# Altium PCB PCB04.PcbDoc
Units mil, origin at the board's own origin, x right, y up, seen from the top; angles counter-clockwise.
Board outline 1200 x 1700 mil, 2 copper layers (Top Layer, Bottom Layer); 21 components, 17 nets, 68 pads, 0 vias.
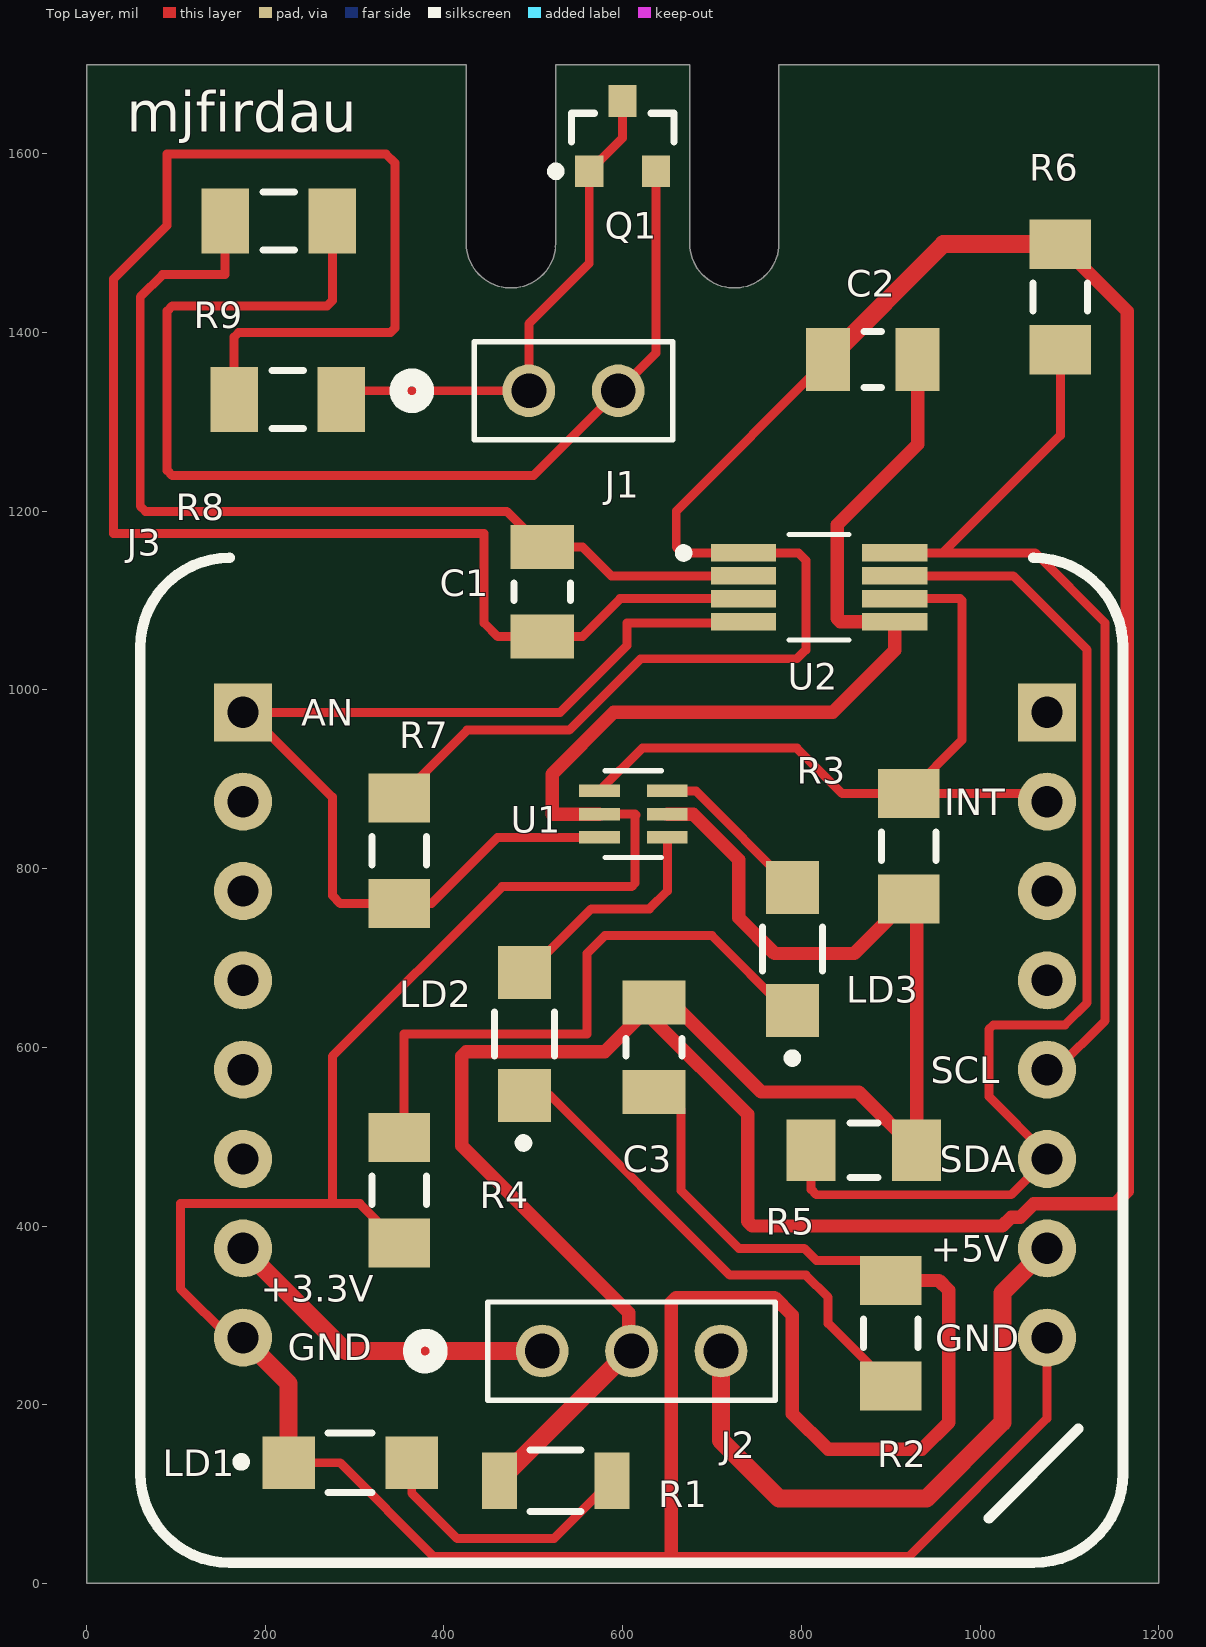
[diagram p0: Top Layer view]
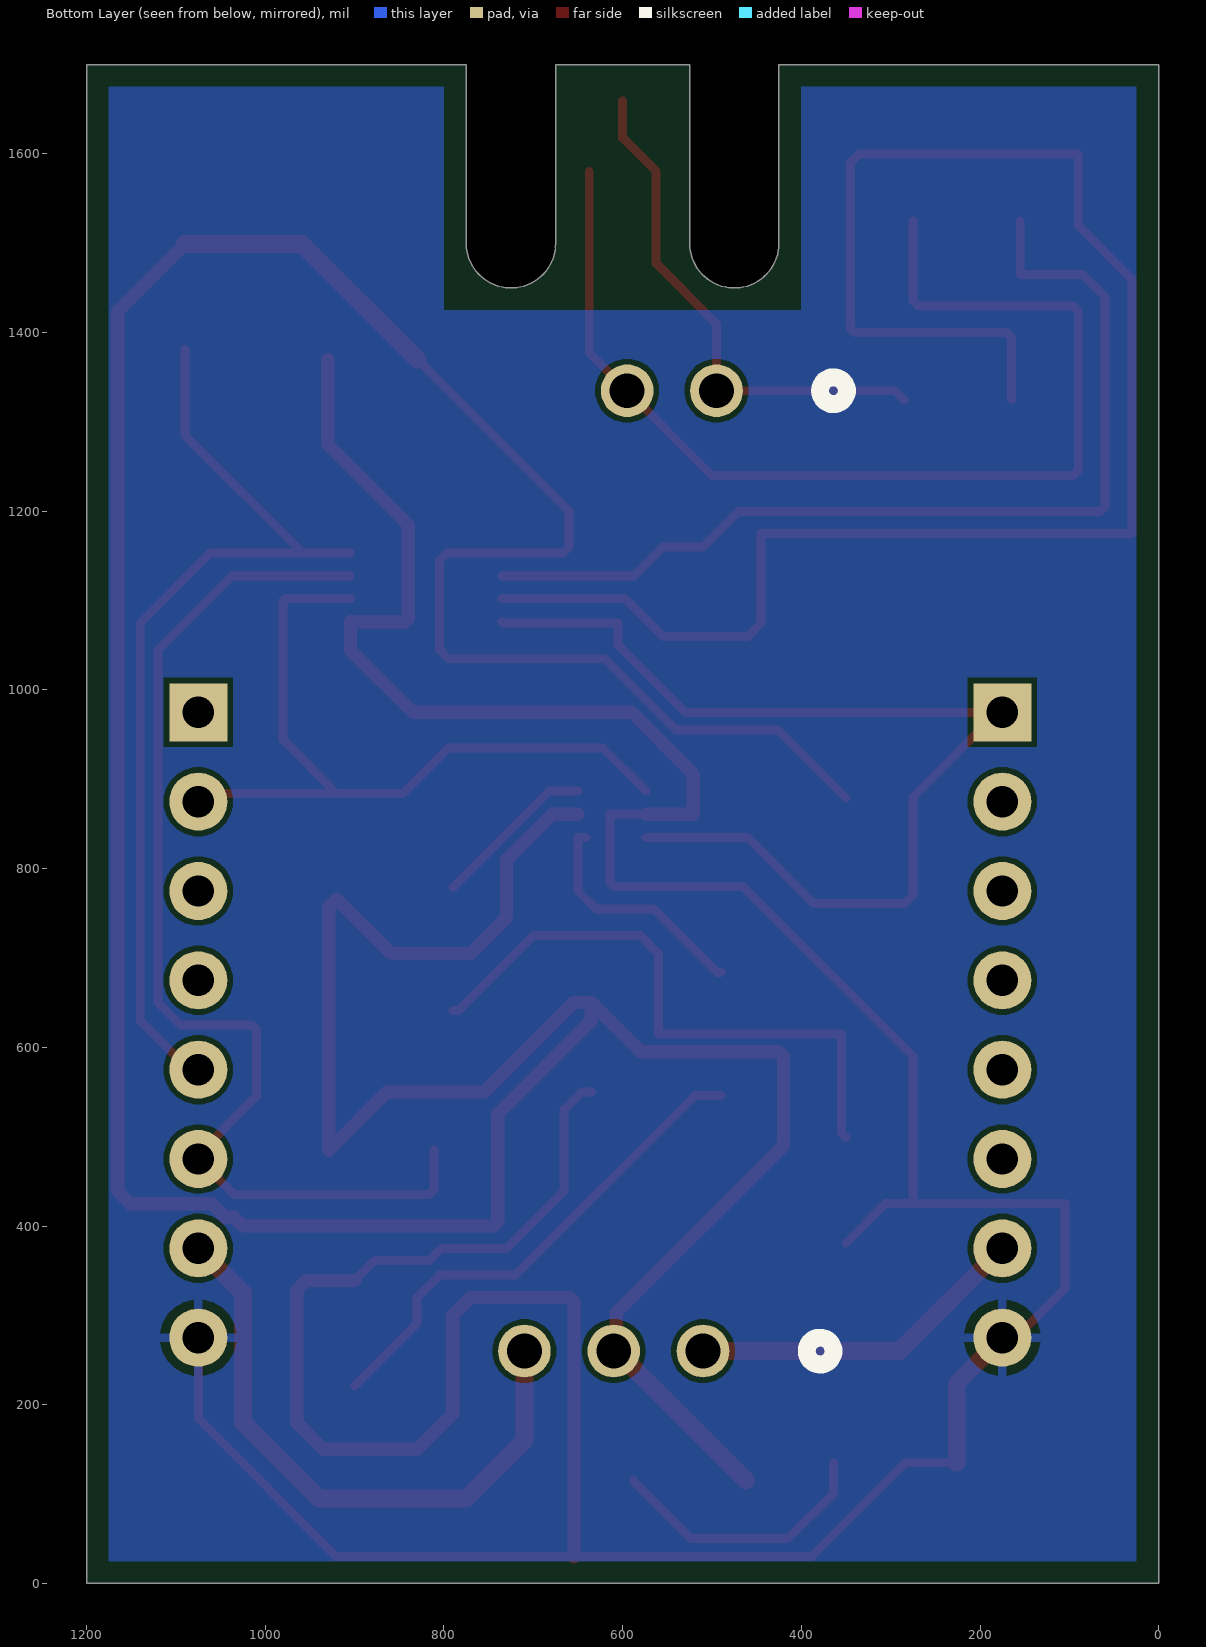
[diagram p1: Bottom Layer view, seen from below]
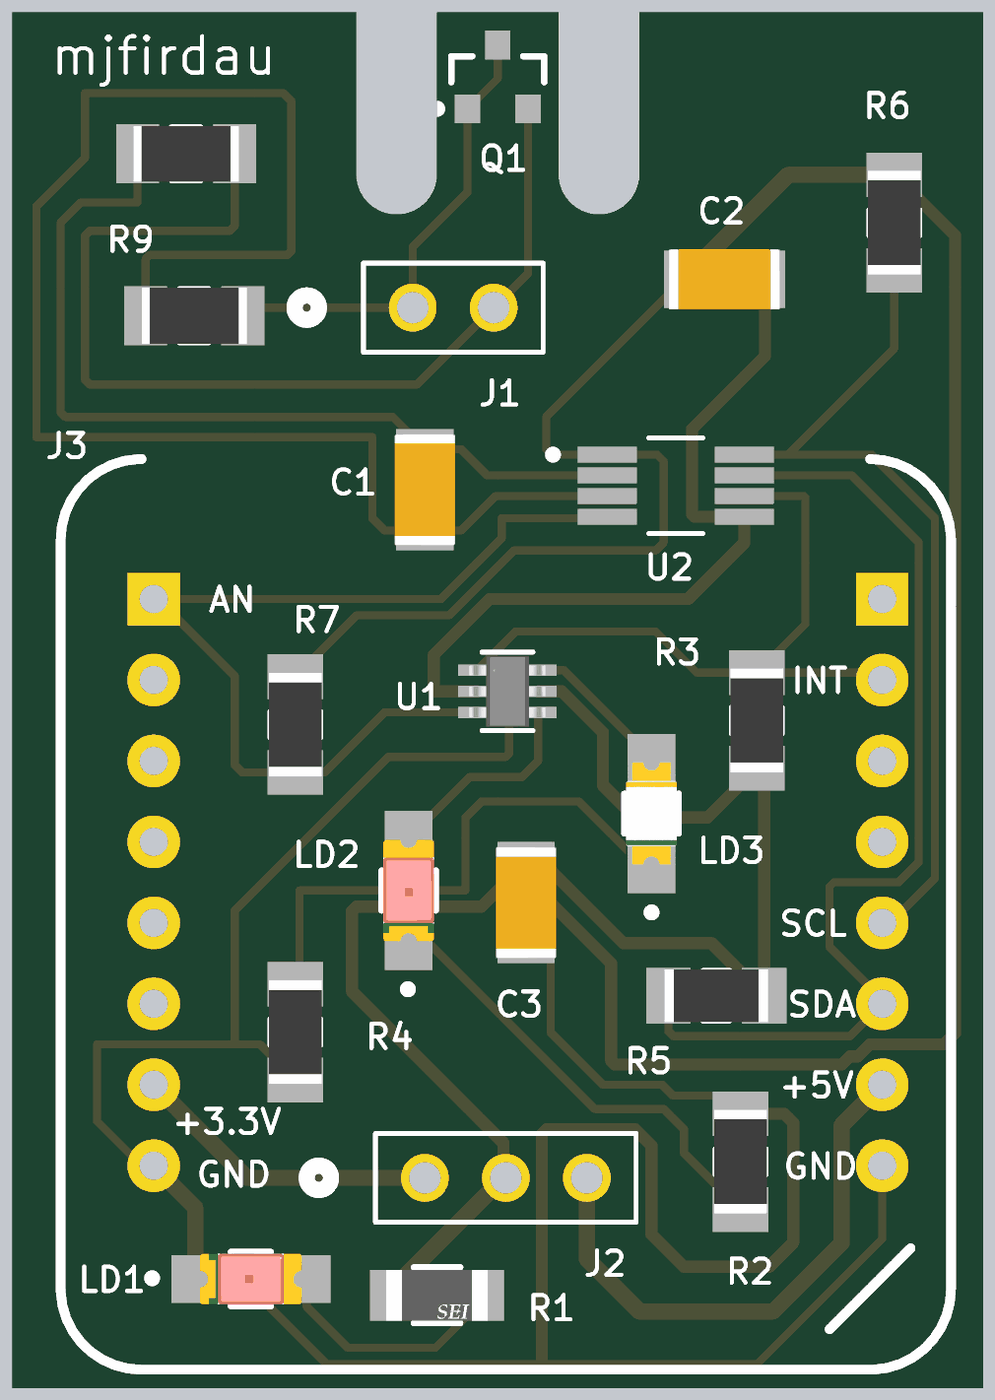
[diagram p2: 3D render of the assembled board from above, using the file's embedded part models]

## Layer stack, top to bottom
Top Solder: solder mask 0.4, Solder Resist, Dk 3.5
Top Layer: signal copper 1.4
Dielectric 1: dielectric 12.6, FR-4, Dk 4.8
Bottom Layer: signal copper 1.4
Bottom Solder: solder mask 0.4, Solder Resist, Dk 3.5

## Board outline
0,0 0,1700 425,1700 425,1500 ccw(c475,1500) 525,1500 525,1700 675,1700 675,1500 ccw(c725,1500) 775,1500 775,1700 1200,1700 1200,0

## Design rules (kind name [scope] priority, off if disabled: settings)
Clearance [All] p1: gap=6 ignorepadtopadclearanceinfootprint=TRUE
PolygonConnect [All] p1: connectstyle=Relief reliefconductorwidth=10 reliefentries=4 polygonreliefangle="90 Angle" airgapwidth=10
RoutingVias [All] p1: holewidth=28 width=50 viastyle="Through Hole" minholewidth=28 minwidth=50 maxholewidth=28 maxwidth=50
SolderMaskExpansion [All] p1: expansion=0 istentingtop=FALSE
SupplyNets "Schematic Supply Nets_3" [InNet('3V3')] p1: voltage=0.000
SupplyNets "Schematic Supply Nets_2" [InNet('GND')] p2: voltage=0.000
SupplyNets "Schematic Supply Nets_1" [InNet('5V')] p3: voltage=0.000
SupplyNets "Schematic Supply Nets" [InNet('VCC')] p4: voltage=0.000
Width [All] p1: maxlimit=25 minlimit=8 preferedwidth=10 minimp=50.000000 maximp=50.000000 favimp=50.000000 checkconnectedcopper=TRUE
30 further rules are at their usual default settings.

## Components (designator, comment, footprint, x,y, rotation, side; value= is the part's Value field where it differs from the comment)
C1 "Capacitor 100 uF +/- 20% 6.3 V 1206" CAPC3216X190X55LL30T25 510,1110 r90 top value=1nF
C2 "Capacitor 100 uF +/- 20% 6.3 V 1206" CAPC3216X190X55LL30T25 880,1370 r0 top value=100nF
C3 "Capacitor 100 uF +/- 20% 6.3 V 1206" CAPC3216X190X55LL30T25 635,600 r270 top value=100nF
J1 "PRPC002SAAN-RC" CONN_PRPC002SAAN-RC_SUL 495,1335 r0 top
J2 "PRPC003SAAN-RC" CONN_PRPC003SAAN-RC_SUL 510,260 r0 top
J3 "MIKROBUS HOST CONN" "MIKROBUS HOST CONN 8gen TH" 625,625 r0 top
LD1 "PWR" FP-LTST-C150KRKT-MFG 295,135 r0 top
LD2 "T CRIT" FP-LTST-C150KRKT-MFG 490,615 r90 top
LD3 "ALERT" FP-LTST-C150KSKT-MFG 790,710 r90 top
Q1 "MMBT3904LT3G" ONSC-SOT-23-3-318-08_V 600,1620 r90 top
R1 "RMCF1206JT470R" FP-RMCF1206-MFG 525,115 r0 top
R2 "Resistor 1k +/-1% 1206 250 mW" RESC3116X70X50ML13T20 900,280 r270 top value=1k
R3 "Resistor 1k +/-1% 1206 250 mW" RESC3116X70X50ML13T20 920,825 r270 top value=2k
R4 "Resistor 1k +/-1% 1206 250 mW" RESC3116X70X50ML13T20 350,440 r90 top value=1k
R5 "Resistor 4k7 +/-1% 1206 250 mW" RESC3116X70X50ML13T20 870,485 r180 top value=4.7k
R6 "Resistor 4k7 +/-1% 1206 250 mW" RESC3116X70X50ML13T20 1090,1440 r270 top value=4.7k
R7 "Resistor 1k +/-1% 1206 250 mW" RESC3116X70X50ML13T20 350,820 r90 top value=2k
R8 "Resistor 0R +/- 5% 1206 250 mW" RESC3216X60X45ML15T20 225,1325 r0 top value=0
R9 "Resistor 0R +/- 5% 1206 250 mW" RESC3216X60X45ML15T20 215,1525 r0 top value=0
U1 "NC7WZ14P6X" SC70-6_ONS 612,861 r0 top
U2 "TMP4718BDGKR" DGK0008A-IPC_A 820,1115 r0 top

## Footprints (in the part's own frame and the unit in brackets; to place one, negate y for a bottom-side part, rotate by r counter-clockwise, add the part's x,y. Pads: shape width x height; smd on the part's side, far side on the other; paste and mask are expansions set on the pad)
CAPC3216X190X55LL30T25 [mm] "Chip Capacitor, 2-Leads, Body 3.5x1.9mm, IPC High Density"
  rect 1.25x1.8 smd: 1(-1.275,0) 2(1.275,0)
  silkscreen extent -0.25,-0.8 0.25,0.8, body extent -1.75,-0.95 1.75,0.95, height 1.9
CONN_PRPC002SAAN-RC_SUL [mil]
  round 59 / inner round 60 / far side round 59 hole 39 paste-99999 mask+0: 1(0,0) 2(100,0)
  silkscreen extent -146,-55 161,55
CONN_PRPC003SAAN-RC_SUL [mil]
  round 59 / inner round 60 / far side round 59 hole 39 paste-99999 mask+0: 1(0,0) 3(200,0)
  round 59 hole 39 paste-99999 mask+0: 2(100,0)
  silkscreen extent -146,-55 261,55
DGK0008A-IPC_A [mm]
  rect 1.857x0.498 smd paste+0 mask+0: 1(-2.151,0.975) 2(-2.151,0.325) 3(-2.151,-0.325) 4(-2.151,-0.975) 5(2.151,-0.975) 6(2.151,-0.325) 7(2.151,0.325) 8(2.151,0.975)
  silkscreen extent -3.98,-1.5 0.85,1.5
FP-LTST-C150KRKT-MFG [mm]
  rect 1.5x1.5 smd paste+0 mask+0: 1(-1.75,0) 2(1.75,0)
  silkscreen extent -3.22,-0.85 0.63,0.85, body extent -2.6,-0.95 2.6,0.95, height 0.25
FP-LTST-C150KSKT-MFG [mm]
  rect 1.5x1.5 smd paste+0 mask+0: 1(-1.75,0) 2(1.75,0)
  silkscreen extent -3.22,-0.85 0.63,0.85, body extent -2.6,-0.95 2.6,0.95, height 0.25
FP-RMCF1206-MFG [mm]
  rect 1x1.6 smd paste+0 mask+0: 1(-1.6,0) 2(1.6,0)
  silkscreen extent -0.72,-0.87 0.72,0.87, body extent -2.2,-0.97 2.2,0.97, height 0.25
"MIKROBUS HOST CONN 8gen TH" [mil]
  rect 65x65 hole 35: 1(-450,350) 16(450,350)
  round 65 hole 35: 2(-450,250) 3(-450,150) 4(-450,50) 5(-450,-50) 6(-450,-150) 7(-450,-250) 8(-450,-350) 9(450,-350) 10(450,-250) 11(450,-150) 12(450,-50) 13(450,50) 14(450,150) 15(450,250)
  silkscreen extent -565,-602 535,523
ONSC-SOT-23-3-318-08_V [mm] "SOT23, 3-Leads, Body 2.92x1.3mm, Pitch 0.95mm"
  rect 0.9x0.8 smd: 1(-1,0.95) 2(-1,-0.95) 3(1,0)
  silkscreen extent -1.12,-1.46 0.65,2.02, body extent -0.65,-1.46 0.65,1.46, height 1.11
RESC3116X70X50ML13T20 [mm] "Chip Resistor, 2-Leads, Body 3.25x1.65mm, IPC Low Density"
  rect 1.4x1.75 smd: 1(-1.5,0) 2(1.5,0)
  silkscreen extent -0.4,-0.77 0.4,0.77, body extent -1.63,-0.82 1.63,0.82, height 0.7
RESC3216X60X45ML15T20 [mm] "Chip Resistor, 2-Leads, Body 3.3x1.75mm, IPC Low Density"
  rect 1.35x1.85 smd: 1(-1.525,0) 2(1.525,0)
  silkscreen extent -0.45,-0.82 0.45,0.82, body extent -1.65,-0.87 1.65,0.87, height 0.6
SC70-6_ONS [mil]
  rect 45.56x13.97 smd paste+0 mask+0: 1(-38,26) 2(-38,0) 3(-38,-26) 4(38,-26) 5(38,0) 6(38,26)
  silkscreen extent -32,-48 32,48, body extent -47,-44 47,44, height 43

## Part data
C1 C2 C3: library part CMP-001-00019-6, "Chip Capacitor, 100 uF, +/- 20%, 6.3 V, 1206 (3216 Metric)", Capacitor Type=Ceramic, Case/Package=1206, Max Operating Temperature=85°C, Min Operating Temperature=-55°C, Tolerance=20%, Voltage Rating=6.3V, Mounting Technology=SM, Pins=2, RoHS Compliant=True
J1: "CONN HEADER .100 SNGL STR 2POS", Manufacturer_Name=Sullins, Copyright="Copyright (C) 2025 Ultra Librarian. All rights reserved.", Manufacturer_Part_Number=PRPC002SAAN-RC, RefDes=RefDes, Type=Type
J2: "Description", Manufacturer_Name=Sullins, Copyright="Copyright (C) 2025 Ultra Librarian. All rights reserved.", Manufacturer_Part_Number=PRPC003SAAN-RC, RefDes=RefDes, Type=Type
LD1: library part CMP-2000-06617-2, "LED GREEN CLEAR 1206 SMD", Case Code (Imperial)=1206, Case Code (Metric)=3216, Color=Red, Forward Current=30mA, Forward Voltage=2V, Lens Color=Colorless, Max Operating Temperature=85°C, Min Operating Temperature=-30°C, Package Quantity=1, Power Dissipation=62.5mW, Power Rating=75mW, Reverse Voltage=5V, Test Current=20mA, Case/Package=1206, Depth=1.6mm, Dominant Wavelength=631nm, Height=1.1mm, Illumination Color=Red, Lead Free="Lead Free", Length=3.2mm, Lens Style=Diffused, Lens Transparency=Clear, Luminous Intensity=54mcd, Mount="Surface Mount", Number of Elements=1, Number of LEDs=1, Number of Pins=2, Packaging="Tape and Reel", Radiation Hardening=No, Viewing Angle=130°, Wavelength=571nm, Width=1.6mm
LD2: library part CMP-2000-06617-2, "LED RED CLEAR 1206 SMD", Case Code (Imperial)=1206, Case Code (Metric)=3216, Color=Red, Forward Current=30mA, Forward Voltage=2V, Lens Color=Colorless, Max Operating Temperature=85°C, Min Operating Temperature=-30°C, Package Quantity=1, Power Dissipation=62.5mW, Power Rating=75mW, Reverse Voltage=5V, Test Current=20mA, Case/Package=1206, Depth=1.6mm, Dominant Wavelength=631nm, Height=1.1mm, Illumination Color=Red, Lead Free="Lead Free", Length=3.2mm, Lens Style=Diffused, Lens Transparency=Clear, Luminous Intensity=54mcd, Mount="Surface Mount", Number of Elements=1, Number of LEDs=1, Number of Pins=2, Packaging="Tape and Reel", Radiation Hardening=No, Viewing Angle=130°, Wavelength=639nm, Width=1.6mm
LD3: library part CMP-2000-06618-2, "LED YELLOW CLEAR 1206 SMD", Case Code (Imperial)=1206, Case Code (Metric)=3216, Color=Yellow, Forward Current=30mA, Forward Voltage=2.4V, Lens Color=Colorless, Max Operating Temperature=85°C, Min Operating Temperature=-55°C, Package Quantity=1, Power Dissipation=75mW, Reverse Voltage=5V, Test Current=20mA, Case/Package=1206, Depth=1.6mm, Dominant Wavelength=587nm, Height=1.1mm, Illumination Color=Yellow, Lead Free="Lead Free", Length=3.2mm, Lens Style=Diffused, Lens Transparency=Clear, Luminous Intensity=60mcd, Mount="Surface Mount", Number of Elements=1, Number of LEDs=1, Number of Pins=2, Packaging="Tape and Reel", Power Rating=75mW, Radiation Hardening=No, Viewing Angle=130°, Wavelength=588nm, Width=1.6mm
Q1: library part CMP-1048-00630-1, "General Purpose Transistor, NPN Silicon, 3-Pin SOT-23, Pb-Free, Tape and Reel", Manufacturer="On Semiconductor", ComponentLink1Description="Manufacturer URL", ComponentLink1URL=http://www.onsemi.com/, ComponentLink2Description=Datasheet, ComponentLink2URL=http://www.onsemi.cn/pub_link/Collateral/MMBT3904LT1-D.PDF, ComponentLink3Description="Package Specification", ComponentLink3URL=http://www.onsemi.cn/pub_link/Collateral/318-08.PDF, DatasheetVersion="Rev. 12", fT Min (MHz)=300, IC Continuous (A)=0.2, Mounting Technology="Surface Mount", PackageDescription="3-Pin Small Outline Transistor, Body 2.92 x 1.3 mm, Pitch 0.95 mm", PackageReference=SOT-23-3-318-08, PackageVersion="Rev. AP, 11/2009", Packing="Tape and Reel", PartNumber=MMBT3904LT3G, Polarity=NPN, RoHS=TRUE
R1: library part CMP-26527-000142-1, "470Ω ±5% 0.25W 1206 Thick Film Chip Resistor AEC-Q200 compliant", Case Code (Imperial)=1206, Case Code (Metric)=3216, Max Operating Temperature=155°C, Max Power Dissipation=250mW, Min Operating Temperature=-55°C, Resistance=470, Resistor Type="Thick Film", Temperature Coefficient=200ppm/°C, Tolerance=5%, Case/Package=1206, Construction=Rectangular, Contact Plating=Tin, Depth=1.6mm, Features="Automotive AEC-Q200", Height=0.028inch, Lead Free="Lead Free", Length=3.2mm, Military Standard=Not, Mount="Surface Mount", Number of Terminations=2, Packaging="Tape and Reel", Power Rating=250mW, Radiation Hardening=No, RoHS Compliant=Yes, Series=RMCF, Size Code=1206, Width=0.063inch
R2 R3 R4 R7: library part CMP-009-00011-5, "Chip Resistor, 1 KOhm, +/- 1%, 0.25 W, -55 to 155 degC, 1206 (3216 Metric)", Case/Package=1206, Max Operating Temperature=155°C, Min Operating Temperature=-55°C, Power=250mW, Tolerance=1%, Voltage Rating=200V, Mounting Technology=SM, Pins=2, RoHS Compliant=True
R5 R6: library part CMP-009-00033-5, "Chip Resistor, 4.7 KOhm, +/- 1%, 0.25 W, -55 to 155 degC, 1206 (3216 Metric)", Case/Package=1206, Max Operating Temperature=155°C, Min Operating Temperature=-55°C, Power=250mW, Tolerance=1%, Voltage Rating=200V, Mounting Technology=SM, Pins=2, RoHS Compliant=True
R8 R9: library part CMP-009-00002-5, "Chip Resistor, 0 Ohm, +/- 5%, 0.25 W, -55 to 155 degC, 1206 (3216 Metric)", Case/Package=1206, Max Operating Temperature=155°C, Min Operating Temperature=-55°C, Power=250mW, Tolerance=5%, Voltage Rating=200V, Mounting Technology=SM, Pins=2, RoHS Compliant=True
U1: "Description", Manufacturer_Name=onsemi, Copyright="Copyright (C) 2026 Ultra Librarian. All rights reserved.", Manufacturer_Part_Number=NC7WZ14P6X, RefDes=RefDes, Type=Type
U2: "High-accuracy remote and local temperature sensor with pin-programmable alert thresholds 8-VSSOP -40 to 125", Manufacturer_Name="Texas Instruments", Copyright="Copyright (C) 2026 Ultra Librarian. All rights reserved.", Manufacturer_Part_Number=TMP4718BDGKR, RefDes=RefDes, Type=TYPE

## Nets (pads, with @x,y where several pads share a name; then routed paths per layer and width w, separated by ;. In a path a pad name is that pad's centre, name@x,y a point inside that pad or via, vN(x,y) a via of type N, cw(c..) or ccw(c..) an arc to the next point about the centre after c; other vN are vias at no path point)
3V3: J2.1 J3.7 | length 382.6
  Top Layer w20: J3.7 290,260 J2.1
5V: J2.3 J3.10 | length 695.3
  Top Layer w20: J2.3@710,255 J2.3 ; J2.3@710,257.5 710,160 775,95 940,95 1025,180 1025,210 1025,325 J3.10
ALR: J3.15 R3.1 U1.1 U2.6 | length 862.8
  Top Layer w10: U1.1 622,935 795,935 845.94,884.06 R3.1 ; U2.6 977.8,1102.2 980,1100 980,944.06 R3.1 ; J3.15 1065.94,884.06 R3.1
DN: C1.2 R9.1 U2.2 | length 1107.1
  Top Layer w10: R9.1 154.96,1465 85,1465 60,1440 60,1205.86 65.86,1200 470.2,1200 C1.2 554.8,1160.2 587.2,1127.8 U2.2
DP: C1.1 R8.1 U2.3 | length 1977.3
  Top Layer w10: R8.1 164.96,1394.96 170,1400 340,1400 345,1405 345,1590 335,1600 90,1600 90,1520 30,1460 30,1175 445,1175 445,1075 460.2,1059.8 C1.1 554.8,1059.8 590,1095 597.2,1102.2 U2.3
GND: C2.2 C3.2 J3.8 J3.9 LD1.1 R2.1 R4.1 U1.2 U2.5 | length 4693.9
  Top Layer w10: J3.8 160,275 105,330 105,425 305.94,425 R4.1 ; LD1.1 283.63,135 388.63,30 920.36,30 1075,184.64 J3.9 ; 275,425 275,590 465,780 610,780 614,784 614,861 ; U1.2 614,861 ; 615,860 614,861 ; C3.2 645.83,549.8 665.43,530.2 665.43,439.57 730,375 803.28,375 816.67,361.61 877.44,361.61 R2.1
  Top Layer w15: U1.2 521,861 521,906 590,975 835,975 904.68,1044.68 U2.5 843.39,1076.61 840,1080 840,1185 930.2,1275.2 C2.2 ; 654.49,30 654.49,314.49 660,320 770,320 790,300 790,190 830,150 935,150 965,180 965,328.11 954.06,339.06 R2.1
  Top Layer w20: J3.8 226.1,223.9 LD1.1
NetJ1_1: J1.1 Q1.1 Q1.3 R8.2 | length 582
  Top Layer w10: R8.2 295.04,1335 J1.1 495,1410 562.6,1477.6 Q1.1 600,1618.03 Q1.3
NetJ1_2: J1.2 Q1.2 R9.2 | length 1267.3
  Top Layer w10: R9.2 275.04,1465 275.04,1435.86 269.18,1430 95.86,1430 90,1424.14 90,1245.86 95.86,1240 500,1240 J1.2 637.4,1377.4 Q1.2
NetLD1_2: LD1.2 R1.2 | length 306.1
  Top Layer w10: LD1.2 363.9,101.1 415,50 522.99,50 R1.2
NetLD2_1: LD2.1 R2.2 | length 561.7
  Top Layer w10: LD2.1 518.9,546.1 720,345 805,345 830,320 830,290.94 R2.2
NetLD2_2: LD2.2 U1.4 | length 266.6
  Top Layer w10: LD2.2 493.9,683.9 565,755 630,755 650,775 U1.4 U1.4@641.1,835
NetLD3_1: LD3.1 R4.2 | length 686.1
  Top Layer w10: R4.2 355,504.06 355,615 560,615 560,705 580,725 700,725 783.9,641.1 LD3.1
NetLD3_2: LD3.2 U1.6 | length 184.8
  Top Layer w10: U1.6 681.9,887 LD3.2
SCL: J3.12 R6.2 U2.8 | length 1082.6
  Top Layer w10: U2.8 958.39,1153.39 ; J3.12 1085,575 1140,630 1140,1075 1061.61,1153.39 1051.61,1153.39 1046.61,1153.39 1001.61,1153.39 958.39,1153.39 ; R6.2 1090,1285 958.39,1153.39
SDA: J3.11 R5.2 U2.7 | length 1276.1
  Top Layer w10: R5.2 810.94,440.94 816.89,435 1035,435 J3.11 ; U2.7 1032.2,1127.8 1037.2,1127.8 1120,1045 1120,1035 1120,650 1095,625 1015,625 1010,620 1010,545 1075,480 J3.11 ; J3.11@1065,475 J3.11
TCR: J3.1 R7.1 U1.3 U2.4 | length 1199.8
  Top Layer w10: U1.3 460,835 385.94,760.94 R7.1 284.06,760.94 275,770 275,880 180,975 J3.1 530,975 605,1050 605,1075 610,1075 733.71,1075 U2.4
VCC: C2.1 C3.1 J2.2 R1.1 R3.2 R5.1 R6.1 R7.2 U1.5 U2.1 | length 5086.3
  Top Layer w10: R7.2 405.94,935 425.94,955 540,955 620,1035 795,1035 805,1045 805,1145 796.61,1153.39 U2.1 666.61,1153.39 660,1160 660,1200.2 C2.1
  Top Layer w15: J2.2@607.01,260 607.01,302.99 420,490 420,590 425,595 579.8,595 C3.1 ; U1.5 657,861 679,861 730,810 730,795 730,745 770,705 859.06,705 R3.2@915.47,761.42 ; R3.2 929.06,756.89 R5.1 864.06,550 755,550 654.8,650.2 C3.1 ; R6.1 1165,1424.06 1165,438.79 1151.21,425 1060,425 1045,410 1035,410 1025,400 745,400 740,405 740,525 635,630 C3.1
  Top Layer w20: R1.1 607.01,260 J2.2 ; C2.1 958.86,1499.06 R6.1
pads on no net: J3.2 J3.3 J3.4 J3.5 J3.6 J3.13 J3.14 J3.16

## Polygon pours and split planes (outlines as drawn)
GND on Bottom Layer "NONET_L-01_P-001" (solid, pour order 0): 25,25 1175,25 1175,1675 800,1675 800,1425 400,1425 400,1675 25,1675

## Silkscreen, mask and mechanical layers (free items; w line width, h text height)
Top Overlay:
  text "mjfirdau" at 45,1625 h45
Mechanical 1:
  the board outline again, w10

## Text inside footprints (layer, text, board x,y; h text height)
J3: Top Overlay "SDA" at 955,460 h30; Top Overlay "+3.3V" at 195,315 h30; Top Overlay "GND" at 225,250 h30; Top Overlay "SCL" at 945,560 h30; Top Overlay "INT" at 960,860 h30; Top Overlay "GND" at 950,260 h30; Top Overlay "+5V" at 945,360 h30; Top Overlay "AN" at 240,960 h30
U1: Mechanical 13 "*" at 588,851.5 h30